# Altium PCB VoiceAssistant-v1.0.PcbDoc (part 1 of 3)
Units mm, origin at the board's own origin, x right, y up, seen from the top; angles counter-clockwise.
Board outline 90 x 90 mm, 2 copper layers (Top Layer, Bottom Layer); 340 components, 253 nets, 950 pads, 0 vias.
Unrouted connection lines stored in the file: 677.
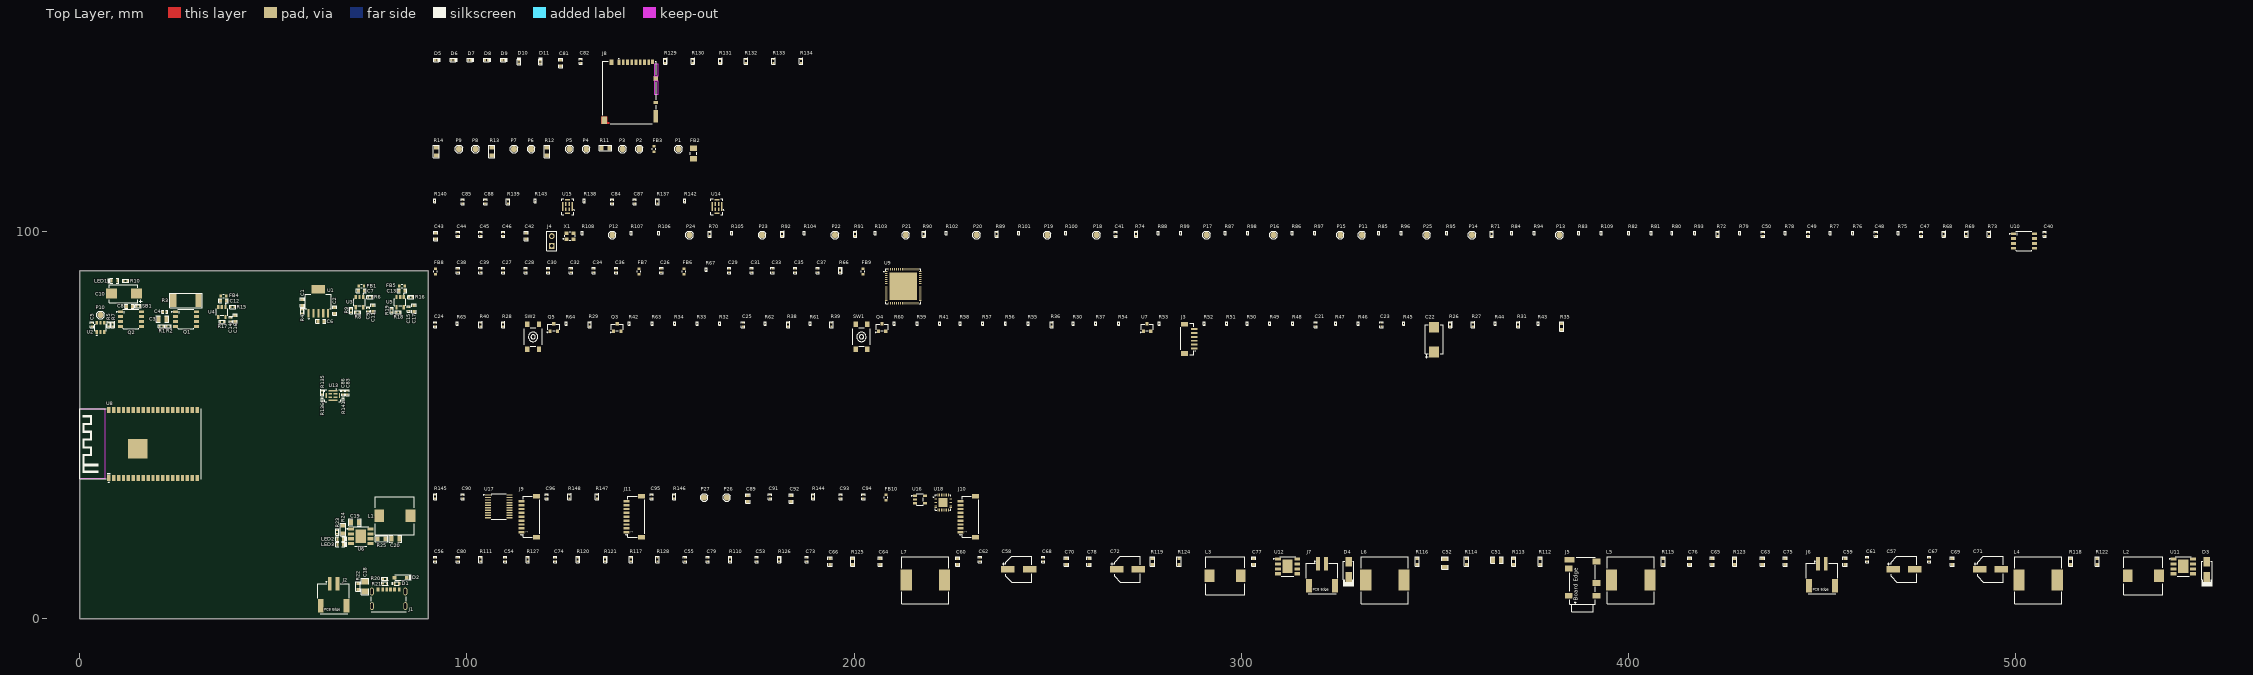
[diagram p0: Top Layer view]
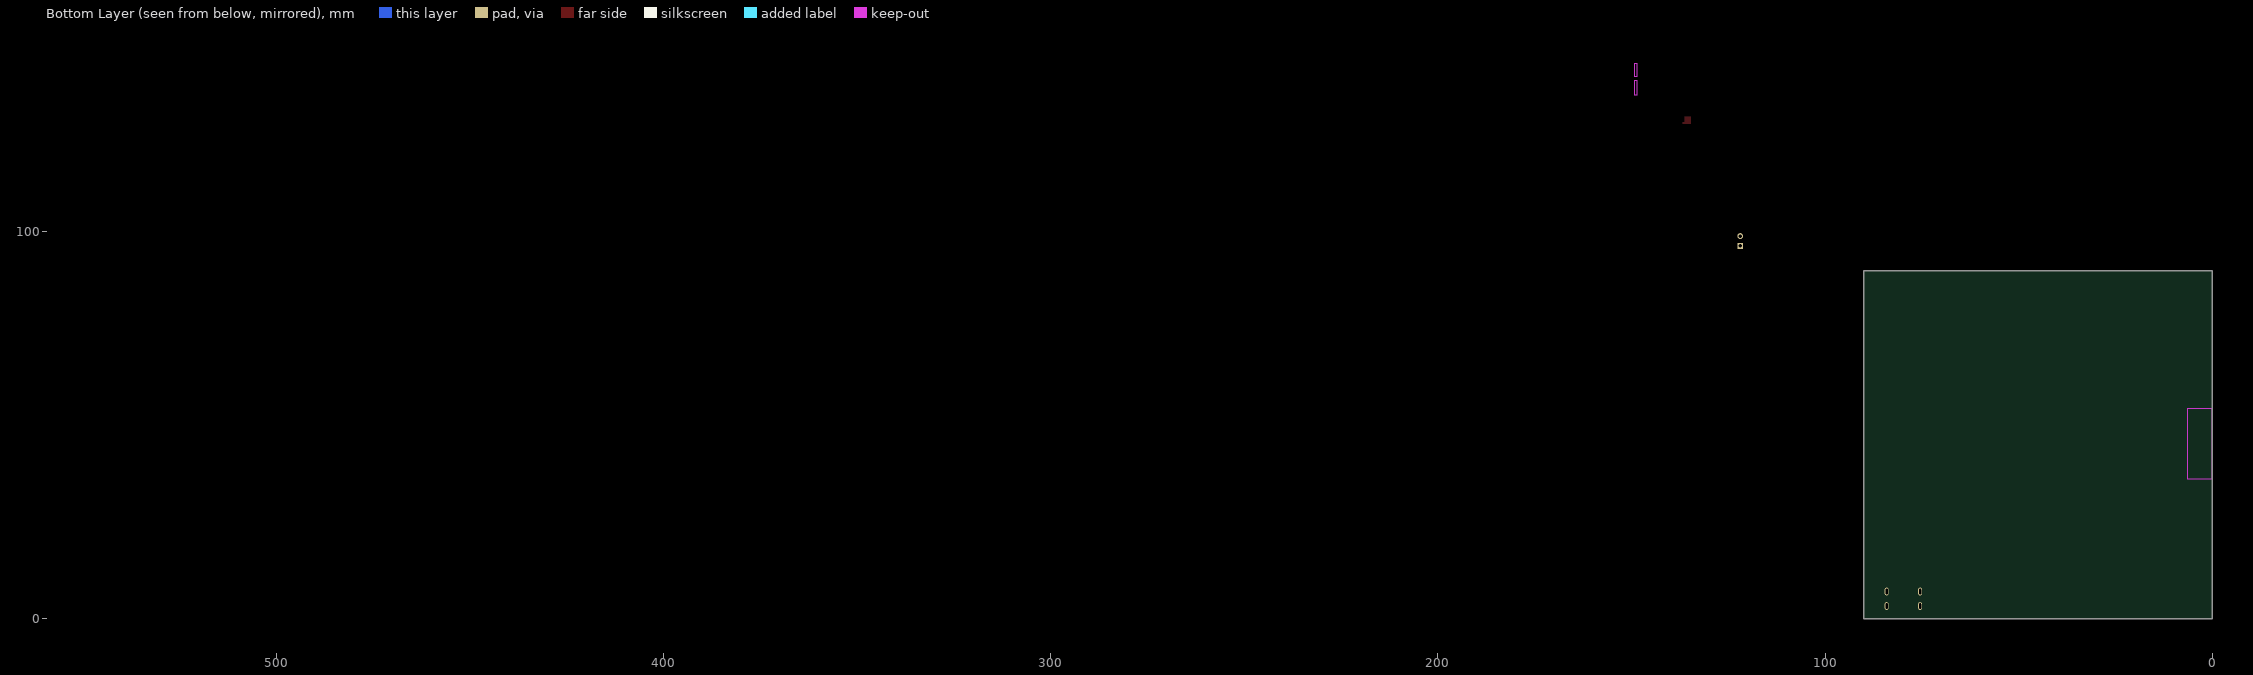
[diagram p1: Bottom Layer view, seen from below]

## Layer stack, top to bottom
Top Solder: solder mask 0.0102, Solder Resist, Dk 3.5
Top Layer: signal copper 0.0356
Dielectric 1: dielectric 0.32, FR-4, Dk 4.8
Bottom Layer: signal copper 0.0356
Bottom Solder: solder mask 0.0102, Solder Resist, Dk 3.5

## Board outline
0,0 0,90 90,90 90,0

## Design rules (kind name [scope] priority, off if disabled: settings)
Clearance [All] p1: gap=0.254 ignorepadtopadclearanceinfootprint=TRUE except(0: Arc-Hole Track-Hole SMDPad-Hole THPad-Hole Via-Hole Fill-Hole Poly-Hole Region-Hole Text-Hole)
MinimumSolderMaskSliver [All] p1: minsoldermaskwidth=0
PolygonConnect [All] p1: thpad.connectstyle=Relief thpad.reliefconductorwidth=0.381 thpad.reliefentries=4 thpad.polygonreliefangle="45 Angle" thpad.airgapwidth=0.254 smdpad.connectstyle=Direct smdpad.reliefconductorwidth=0.254 smdpad.reliefentries=4 smdpad.polygonreliefangle="90 Angle" smdpad.airgapwidth=0.254 via.connectstyle=Direct via.reliefconductorwidth=0.254 via.reliefentries=4 via.polygonreliefangle="90 Angle" via.airgapwidth=0.254
RoutingVias [All] p1: holewidth=0.3 width=0.6 viastyle="Through Hole" minholewidth=0.3 minwidth=0.6 maxholewidth=0.3 maxwidth=0.6
SilkToSilkClearance [All] p1: silktosilkclearance=0.127
SilkToSolderMaskClearance [IsPad] p1: minsilkscreentomaskgap=0 clearancetoexposedcopper=TRUE
SolderMaskExpansion [All] p1: expansion=0.102 istentingtop=FALSE
UnRoutedNet [All] p1: checkbadconnections=TRUE
Width [All] p1: maxlimit=1.27 minlimit=0.203 preferedwidth=0.381 minimp=50.000000 maximp=50.000000 favimp=50.000000
26 further rules are at their usual default settings.

## Classes and differential pairs
component class U_SD-Card-Sheet: C81 C82 D5 D6 D7 D8 D9 D10 D11 J8 R129 R130 R131 R132 R133 R134
component class U_Power-Sheet: C1 C2 C3 C4 C5 C6 C7 C8 C9 C10 C11 C12 C13 C14 C15 C16 C17 FB1 FB2 FB3 FB4 FB5 LED1 P1 P2 P3 P4 P5 P6 P7 P8 P9 P10 Q1 Q2 R1 R2 R3 R4 R5 R6 R7 R8 R9 R10 R11 R12 R13 R14 R15 R16 R17 R18 R19 SB1 U1 U2 U3 U4 U5
component class U_MICs-Sheet: C83 C84 C85 C86 C87 C88 R135 R136 R137 R138 R139 R140 R141 R142 R143 U13 U14 U15
component class U_DSP-Sheet-2: C40 C41 C42 C43 C44 C45 C46 C47 C48 C49 C50 J4 P11 P12 P13 P14 P15 P16 P17 P18 P19 P20 P21 P22 P23 P24 P25 R68 R69 R70 R71 R72 R73 R74 R75 R76 R77 R78 R79 R80 R81 R82 R83 R84 R85 R86 R87 R88 R89 R90 R91 R92 R93 R94 R95 R96 R97 R98 R99 R100 R101 R102 R103 R104 R105 R106 R107 R108 R109 U10 X1
component class U_DSP-Sheet-1: C26 C27 C28 C29 C30 C31 C32 C33 C34 C35 C36 C37 C38 C39 FB6 FB7 FB8 FB9 R66 R67 U9
component class U_Controller-Sheet: C21 C22 C23 C24 C25 J3 Q3 Q4 Q5 R26 R27 R28 R29 R30 R31 R32 R33 R34 R35 R36 R37 R38 R39 R40 R41 R42 R43 R44 R45 R46 R47 R48 R49 R50 R51 R52 R53 R54 R55 R56 R57 R58 R59 R60 R61 R62 R63 R64 R65 SW1 SW2 U7 U8
component class U_Charging-Sheet: C18 C19 C20 D1 D2 J1 J2 L1 LED2 LED3 R20 R21 R22 R23 R24 R25 U6
component class U_Buttons-LED-Sheet: C89 C90 C91 C92 C93 C94 C95 C96 FB10 J9 J10 J11 P26 P27 R144 R145 R146 R147 R148 U16 U17 U18
component class U_Amplifier-Sheet: C51 C52 C53 C54 C55 C56 C57 C58 C59 C60 C61 C62 C63 C64 C65 C66 C67 C68 C69 C70 C71 C72 C73 C74 C75 C76 C77 C78 C79 C80 D3 D4 J5 J6 J7 L2 L3 L4 L5 L6 L7 R110 R111 R112 R113 R114 R115 R116 R117 R118 R119 R120 R121 R122 R123 R124 R125 R126 R127 R128 U11 U12

## Components (designator, comment, footprint, x,y, rotation, side; value= is the part's Value field where it differs from the comment)
C1 "10uF" Cap-0603 57.48,81.788 r270 top
C2 "10nF" Cap-0603 65.811,79.729 r270 top
C3 "22uF" Cap-0805 21.361,77.495 r0 top
C4 "100nF" Cap-0402 21.907,79.4 r0 top
C5 "100nF" Cap-0402 3.124,76.06 r90 top
C6 "22uF" Cap-0603 62.23,76.937 r0 top
C7 "10uF" Cap-0603 72.695,84.76 r0 top
C8 "10uF" Cap-0603 12.769,80.823 r0 top
C9 "100nF" Cap-0402 74.473,79.921 r270 top
C10 "100uF" Case-E 14.58,84.049 r180 top
C11 "10uF" Cap-0603 75.717,80.213 r270 top
C12 "10uF" Cap-0603 37.109,82.22 r0 top
C13 "10uF" Cap-0603 83.236,84.76 r0 top
C14 "100nF" Cap-0402 38.964,77.381 r270 top
C15 "100nF" Cap-0402 84.988,80.094 r270 top
C16 "10uF" Cap-0603 40.132,77.673 r270 top
C17 "10uF" Cap-0603 86.309,80.213 r270 top
C18 "4.7nF" Cap-1206 73.635,8.356 r270 top
C19 "22uF" Cap-0805 71.061,24.994 r180 top
C20 "22uF" Cap-0805 81.483,20.726 r180 top
C21 "100nF" Cap-0402 319.278,76.073 r90 top
C22 "100uF" Case-E 349.885,68.961 r90 top
C23 "100nF" Cap-0402 336.296,76.073 r90 top
C24 "100nF" Cap-0402 91.821,76.073 r90 top
C25 "100nF" Cap-0402 171.323,76.073 r90 top
C26 "100nF" Cap-0402 150.241,90.043 r90 top
C27 "100nF" Cap-0402 109.347,90.043 r90 top
C28 "100nF" Cap-0402 115.189,90.043 r90 top
C29 "100nF" Cap-0402 167.767,90.043 r90 top
C30 "100nF" Cap-0402 121.031,90.043 r90 top
C31 "100nF" Cap-0402 173.609,90.043 r90 top
C32 "100nF" Cap-0402 126.873,90.043 r90 top
C33 "100nF" Cap-0402 178.943,90.043 r90 top
C34 "100nF" Cap-0402 132.715,90.043 r90 top
C35 "100nF" Cap-0402 184.785,90.043 r90 top
C36 "100nF" Cap-0402 138.557,90.043 r90 top
C37 "100nF" Cap-0402 190.627,90.043 r90 top
C38 "100nF" Cap-0402 97.663,90.043 r90 top
C39 "100nF" Cap-0402 103.505,90.043 r90 top
C40 "100nF" Cap-0402 507.619,99.441 r90 top
C41 "100nF" Cap-0402 267.589,99.441 r90 top
C42 "18pF" Cap-0603 115.316,98.933 r90 top
C43 "18pF" Cap-0603 91.948,98.933 r90 top
C44 "100nF" Cap-0402 97.663,99.441 r90 top
C45 "1uF" Cap-0402 103.505,99.441 r90 top
C46 "100nF" Cap-0402 109.347,99.441 r90 top
C47 "1uF" Cap-0402 475.742,99.441 r90 top
C48 "1uF" Cap-0402 464.058,99.441 r90 top
C49 "1uF" Cap-0402 446.532,99.441 r90 top
C50 "1uF" Cap-0402 434.848,99.441 r90 top
C51 "22uF" Cap-0805 366.141,15.24 r0 top
C52 "22uF" Cap-0805 352.679,14.478 r90 top
C53 "100nF" Cap-0402 174.879,15.367 r90 top
C54 "100nF" Cap-0402 109.855,15.367 r90 top
C55 "39pF" Cap-0402 156.337,15.367 r90 top
C56 "39pF" Cap-0402 91.821,15.367 r90 top
C57 "470uF" RVT1C471M0607 471.297,12.573 r0 top
C58 "470uF" RVT1C471M0607 242.57,12.573 r0 top
C59 "10uF" Cap-0603 456.057,14.859 r90 top
C60 "10uF" Cap-0603 226.822,14.859 r90 top
C61 "1uF" Cap-0402 461.772,15.367 r90 top
C62 "1uF" Cap-0402 232.537,15.367 r90 top
C63 "1nF" CAP-0603 434.721,14.859 r90 top
C64 "1nF" CAP-0603 206.756,14.859 r90 top
C65 "3.3nF" Cap-0603 421.767,14.859 r90 top
C66 "3.3nF" Cap-0603 193.802,14.859 r90 top
C67 "1uF" Cap-0402 477.774,15.367 r90 top
C68 "1uF" Cap-0402 248.92,15.367 r90 top
C69 "10uF" Cap-0603 483.743,14.859 r90 top
C70 "10uF" Cap-0603 254.889,14.859 r90 top
C71 "470uF" RVT1C471M0607 493.649,12.573 r0 top
C72 "470uF" RVT1C471M0607 270.637,12.573 r0 top
C73 "100nF" Cap-0402 187.833,15.367 r90 top
C74 "100nF" Cap-0402 122.809,15.367 r90 top
C75 "330pF" Cap-0603 440.563,14.859 r90 top
C76 "330pF" Cap-0603 415.925,14.859 r90 top
C77 "330pF" Cap-0603 303.276,14.859 r90 top
C78 "330pF" Cap-0603 260.731,14.859 r90 top
C79 "39pF" Cap-0402 162.179,15.367 r90 top
C80 "39pF" Cap-0402 97.663,15.367 r90 top
C81 "10uF" Cap-0603 124.206,143.637 r90 top
C82 "100nF" Cap-0402 129.413,144.145 r90 top
C83 "1uF" Cap-0402 69.113,58.471 r90 top
C84 "1uF" Cap-0402 137.541,107.823 r90 top
C85 "1uF" Cap-0402 98.933,107.823 r90 top
C86 "100nF" Cap-0402 68.072,58.471 r90 top
C87 "100nF" Cap-0402 143.383,107.823 r90 top
C88 "100nF" Cap-0402 104.775,107.823 r90 top
C89 "10uF" Cap-0603 172.593,31.115 r90 top
C90 "100nF" Cap-0402 98.933,31.623 r90 top
C91 "100nF" Cap-0402 178.308,31.623 r90 top
C92 "10uF" Cap-0603 183.769,31.115 r90 top
C93 "1uF" Cap-0402 196.596,31.623 r90 top
C94 "100nF" Cap-0402 202.438,31.623 r90 top
C95 "220nF" Cap-0402 147.701,31.623 r90 top
C96 "100nF" Cap-0402 120.65,31.623 r90 top
D1 "LESD5D5.0CT1G" SOD-523 81.876,9.169 r180 top
D2 "1N5819HW-7-F" SOD-123 82.851,10.706 r0 top
D3 "SS34" SMA 549.529,12.827 r90 top
D4 "SS34" SMA 327.787,12.827 r90 top
D5 "LESD8D3.3CAT5G" SOD-882 92.075,144.399 r0 top
D6 "LESD8D3.3CAT5G" SOD-882 96.393,144.399 r0 top
D7 "LESD8D3.3CAT5G" SOD-882 100.711,144.399 r0 top
D8 "LESD8D3.3CAT5G" SOD-882 105.029,144.399 r0 top
D9 "LESD8D3.3CAT5G" SOD-882 109.347,144.399 r0 top
D10 "LESD8D3.3CAT5G" SOD-882 113.411,143.891 r90 top
D11 "LESD8D3.3CAT5G" SOD-882 118.999,143.891 r90 top
FB1 "BLM18SG121TZ1D" "IND-0603 (1608 Metric)" 72.695,86.004 r0 top value=25mR
FB2 "BLM31KN121SZ1L" IND-1206 158.496,120.269 r90 top value=9mR
FB3 "BLM18SG121TZ1D" "IND-0603 (1608 Metric)" 148.336,121.412 r90 top value=25mR
FB4 "BLM18SG121TZ1D" "IND-0603 (1608 Metric)" 37.109,83.464 r0 top value=25mR
FB5 "BLM18SG121TZ1D" "IND-0603 (1608 Metric)" 83.236,86.004 r0 top value=25mR
FB6 "BLM18SG121TZ1D" "IND-0603 (1608 Metric)" 156.083,89.789 r90 top value=25mR
FB7 "BLM18SG121TZ1D" "IND-0603 (1608 Metric)" 144.399,89.789 r90 top value=25mR
FB8 "BLM18SG121TZ1D" "IND-0603 (1608 Metric)" 91.821,89.789 r90 top value=25mR
FB9 "BLM18SG121TZ1D" "IND-0603 (1608 Metric)" 202.311,89.789 r90 top value=25mR
FB10 "BLM18SG121TZ1D" "IND-0603 (1608 Metric)" 208.28,31.369 r90 top value=25mR
J1 "U262-061N-4BVC11" U262-061N-4BVC11 79.756,5.461 r0 top
J2 "WAFER-PH2.0-2PWB" WAFER-PH2.0-2PWB 65.548,6.218 r0 top
J3 "Voltlink Target" "Voltlink Target" 286.639,72.39 r90 top
J4 "X6511WV-02H-C60D30" HDR1X2_ 121.92,96.393 r90 top
J5 "PJ-342B-TX-SMT" PJ-342B-TX-SMT_ 388.239,10.668 r90 top
J6 "WAFER-PH2.0-2PWB" WAFER-PH2.0-2PWB 450.088,11.43 r0 top
J7 "WAFER-PH2.0-2PWB" WAFER-PH2.0-2PWB 320.929,11.43 r0 top
J8 "DM3BT-DSF-PEJS" DM3BT-DSF-PEJS 142.113,136.398 r0 top
J9 "X1002WRS-09E-LPSWHF" X1002WRS-09E-LPSWHF 116.078,26.416 r90 top
J10 "X1002WRS-09E-LPSWHF" X1002WRS-09E-LPSWHF 229.489,26.416 r90 top
J11 "X1002WRS-09E-LPSWHF" X1002WRS-09E-LPSWHF 143.129,26.416 r90 top
L1 "4.7uH" YSLF1045-4R7M 81.376,26.657 r0 top
L2 "4.7uH" YSLF1045-4R7M 533.146,11.176 r0 top
L3 "4.7uH" YSLF1045-4R7M 295.91,11.176 r0 top
L4 "33uH" SMDRI129-330MT 505.968,10.033 r0 top
L5 "33uH" SMDRI129-330MT 400.685,10.033 r0 top
L6 "33uH" SMDRI129-330MT 337.185,10.033 r0 top
L7 "33uH" SMDRI129-330MT 218.44,10.033 r0 top
LED1 "RED" LED-0603 8.89,87.376 r180 top
LED2 "Emerald" LED-0603 67.246,20.65 r0 top
LED3 "RED" LED-0603 67.246,19.228 r0 top
P1 "TEST POINT" Test-point 154.686,121.412 r0 top
P2 "TEST POINT" Test-point 144.526,121.412 r0 top
P3 "TEST POINT" Test-point 140.208,121.412 r0 top
P4 "TEST POINT" Test-point 130.81,121.412 r0 top
P5 "TEST POINT" Test-point 126.492,121.412 r0 top
P6 "TEST POINT" Test-point 116.586,121.412 r0 top
P7 "TEST POINT" Test-point 112.141,121.412 r0 top
P8 "TEST POINT" Test-point 102.235,121.412 r0 top
P9 "TEST POINT" Test-point 97.917,121.412 r0 top
P10 "TEST POINT" Test-point 5.293,78.562 r0 top
P11 "TEST POINT" Test-point 331.216,99.187 r0 top
P12 "TEST POINT" Test-point 137.541,99.187 r0 top
P13 "TEST POINT" Test-point 382.27,99.187 r0 top
P14 "TEST POINT" Test-point 359.664,99.187 r0 top
P15 "TEST POINT" Test-point 325.628,99.187 r0 top
P16 "TEST POINT" Test-point 308.356,99.187 r0 top
P17 "TEST POINT" Test-point 291.084,99.187 r0 top
P18 "TEST POINT" Test-point 262.636,99.187 r0 top
P19 "TEST POINT" Test-point 249.936,99.187 r0 top
P20 "TEST POINT" Test-point 231.648,99.187 r0 top
P21 "TEST POINT" Test-point 213.36,99.187 r0 top
P22 "TEST POINT" Test-point 195.072,99.187 r0 top
P23 "TEST POINT" Test-point 176.276,99.187 r0 top
P24 "TEST POINT" Test-point 157.48,99.187 r0 top
P25 "TEST POINT" Test-point 347.98,99.187 r0 top
P26 "TEST POINT" Test-point 167.132,31.369 r0 top
P27 "TEST POINT" Test-point 161.29,31.369 r0 top
Q1 "IRF7410TRPBF" SOP-8 27.381,77.495 r0 top
Q2 "IRF7410TRPBF" SOP-8 13.183,77.495 r0 top
Q3 "SS8050-G" SOT-23 138.811,75.311 r0 top
Q4 "LBSS138LT1G" SOT-23 207.264,75.311 r0 top
Q5 "LBSS138LT1G" SOT-23 122.428,75.311 r0 top
R1 "100K" Res-0402 21.069,75.59 r0 top
R2 "100K" Res-0402 22.847,75.59 r0 top
R3 "0R" RES-2512 27.381,82.296 r180 top
R4 "10K" Res-0402 57.48,79.437 r90 top
R5 "0R" Res-0402 7.442,76.06 r270 top
R6 "10K" Res-0402 74.943,83.164 r180 top
R7 "10K" Res-0402 8.509,76.06 r90 top
R8 "52.3K" Res-0402 71.732,79.223 r0 top
R9 "30.1K" Res-0402 70.053,79.692 r270 top
R10 "1K" Res-0402 11.798,87.376 r0 top
R11 "0R" Res-0805 135.763,121.666 r0 top
R12 "0R" Res-0805 120.65,120.777 r90 top
R13 "0R" Res-0805 106.426,120.777 r90 top
R14 "0R" Res-0805 92.075,120.777 r90 top
R15 "10K" Res-0402 39.433,80.624 r180 top
R16 "10K" Res-0402 85.458,83.164 r180 top
R17 "0R" Res-0402 36.728,76.759 r0 top
R18 "52.3K" Res-0402 82.248,79.223 r0 top
R19 "30.1K" Res-0402 80.543,79.692 r270 top
R20 "5.1K" Res-0402 78.786,10.388 r0 top
R21 "5.1K" Res-0402 78.786,9.169 r0 top
R22 "1M" Res-0603 71.857,8.356 r270 top
R23 "1K" Res-0402 66.496,22.466 r90 top
R24 "316R" RES-0805 67.996,23.089 r270 top
R25 "1K" RES-0805 77.927,20.726 r0 top value=1kR
R26 "10K" Res-0402 354.076,76.073 r90 top
R27 "10K" Res-0402 359.918,76.073 r90 top
R28 "100K" Res-0402 109.347,76.073 r90 top
R29 "1K" Res-0402 131.699,76.073 r90 top
R30 "0R" Res-0201 256.667,76.327 r90 top
R31 "10K" Res-0402 371.602,76.073 r90 top
R32 "0R" Res-0201 165.354,76.327 r90 top
R33 "0R" Res-0201 159.512,76.327 r90 top
R34 "0R" Res-0201 153.67,76.327 r90 top
R35 "0R" Res-0603 382.905,75.565 r90 top
R36 "100K" Res-0402 251.079,76.073 r90 top
R37 "0R" Res-0201 262.509,76.327 r90 top
R38 "10K" Res-0402 183.007,76.073 r90 top
R39 "1K" Res-0402 194.183,76.073 r90 top
R40 "1K" Res-0402 103.505,76.073 r90 top
R41 "0R" Res-0201 222.123,76.327 r90 top
R42 "0R" Res-0201 141.986,76.327 r90 top
R43 "0R" Res-0201 376.809,76.327 r90 top
R44 "0R" Res-0201 365.633,76.327 r90 top
R45 "0R" Res-0201 342.011,76.327 r90 top
R46 "0R" Res-0201 330.327,76.327 r90 top
R47 "0R" Res-0201 324.485,76.327 r90 top
R48 "0R" Res-0201 313.309,76.327 r90 top
R49 "0R" Res-0201 307.467,76.327 r90 top
R50 "0R" Res-0201 301.625,76.327 r90 top
R51 "0R" Res-0201 296.291,76.327 r90 top
R52 "0R" Res-0201 290.449,76.327 r90 top
R53 "0R" Res-0201 278.892,76.327 r90 top
R54 "0R" Res-0201 268.351,76.327 r90 top
R55 "0R" Res-0201 244.983,76.327 r90 top
R56 "0R" Res-0201 239.141,76.327 r90 top
R57 "0R" Res-0201 233.299,76.327 r90 top
R58 "0R" Res-0201 227.457,76.327 r90 top
R59 "0R" Res-0201 216.281,76.327 r90 top
R60 "0R" Res-0201 210.439,76.327 r90 top
R61 "0R" Res-0201 188.722,76.327 r90 top
R62 "0R" Res-0201 177.038,76.327 r90 top
R63 "0R" Res-0201 147.828,76.327 r90 top
R64 "0R" Res-0201 125.603,76.327 r90 top
R65 "0R" Res-0201 97.536,76.327 r90 top
R66 "10K" Res-0402 196.469,90.043 r90 top
R67 "0R" Res-0201 161.798,90.297 r90 top
R68 "10K" Res-0402 481.584,99.441 r90 top
R69 "10K" Res-0402 487.426,99.441 r90 top
R70 "10K" Res-0402 162.687,99.441 r90 top
R71 "10K" Res-0402 364.744,99.441 r90 top
R72 "100K" Res-0402 423.164,99.441 r90 top
R73 "100K" Res-0402 493.268,99.441 r90 top
R74 "100K" Res-0402 272.923,99.441 r90 top
R75 "33R" Res-0201 469.773,99.695 r90 top
R76 "33R" Res-0201 458.089,99.695 r90 top
R77 "33R" Res-0201 452.247,99.695 r90 top
R78 "33R" Res-0201 440.563,99.695 r90 top
R79 "33R" Res-0201 428.879,99.695 r90 top
R80 "33R" Res-0201 411.353,99.695 r90 top
R81 "33R" Res-0201 406.019,99.695 r90 top
R82 "33R" Res-0201 400.177,99.695 r90 top
R83 "33R" Res-0201 387.223,99.695 r90 top
R84 "33R" Res-0201 369.951,99.695 r90 top
R85 "33R" Res-0201 335.534,99.695 r90 top
R86 "33R" Res-0201 313.182,99.695 r90 top
R87 "33R" Res-0201 295.91,99.695 r90 top
R88 "33R" Res-0201 278.638,99.695 r90 top
R89 "100K" Res-0402 236.855,99.441 r90 top
R90 "100K" Res-0402 218.059,99.441 r90 top
R91 "100K" Res-0402 200.279,99.441 r90 top
R92 "100K" Res-0402 181.483,99.441 r90 top
R93 "33R" Res-0201 417.195,99.695 r90 top
R94 "33R" Res-0201 375.793,99.695 r90 top
R95 "33R" Res-0201 353.187,99.695 r90 top
R96 "33R" Res-0201 341.376,99.695 r90 top
R97 "33R" Res-0201 319.024,99.695 r90 top
R98 "33R" Res-0201 301.752,99.695 r90 top
R99 "33R" Res-0201 284.48,99.695 r90 top
R100 "33R" Res-0201 254.762,99.695 r90 top
R101 "33R" Res-0201 242.57,99.695 r90 top
R102 "33R" Res-0201 223.774,99.695 r90 top
R103 "33R" Res-0201 205.486,99.695 r90 top
R104 "33R" Res-0201 187.198,99.695 r90 top
R105 "33R" Res-0201 168.402,99.695 r90 top
R106 "33R" Res-0201 149.606,99.695 r90 top
R107 "33R" Res-0201 142.494,99.695 r90 top
R108 "33R" Res-0201 129.794,99.695 r90 top
R109 "3.3K" Res-0201 393.065,99.695 r90 top
R110 "56k" Res-0402 168.021,15.367 r90 top value=56kR
R111 "56k" Res-0402 103.505,15.367 r90 top value=56kR
R112 "0R" Res-0603 377.317,14.859 r90 top
R113 "0R" Res-0603 370.459,14.859 r90 top
R114 "0R" Res-0603 358.267,14.859 r90 top
R115 "22.1K" Res-0603 409.067,14.859 r90 top
R116 "0R" Res-0603 345.567,14.859 r90 top
R117 "DNP" Res-0402 142.367,15.367 r90 top
R118 "1R" Res-0603 514.35,14.859 r90 top
R119 "1R" Res-0603 277.114,14.859 r90 top
R120 "18K" Res-0402 128.651,15.367 r90 top value=18kR
R121 "28K" Res-0402 135.763,15.367 r90 top
R122 "510K" Res-0603 521.208,14.859 r90 top
R123 "110K" Res-0603 427.609,14.859 r90 top
R124 "510K" Res-0603 283.972,14.859 r90 top
R125 "110K" Res-0603 199.644,14.859 r90 top
R126 "30K" Res-0402 180.721,15.367 r90 top
R127 "30K" Res-0402 115.697,15.367 r90 top
R128 "DNP" Res-0402 149.225,15.367 r90 top
R129 "10K" Res-0402 151.257,144.145 r90 top
R130 "10K" Res-0402 158.369,144.145 r90 top
R131 "10K" Res-0402 165.481,144.145 r90 top
R132 "10K" Res-0402 172.085,144.145 r90 top
R133 "10K" Res-0402 179.197,144.145 r90 top
R134 "10K" Res-0402 186.309,144.145 r90 top
R135 "10K" Res-0402 62.636,58.483 r270 top
R136 "33R" Res-0201 62.636,56.638 r270 top
R137 "10K" Res-0402 149.225,107.823 r90 top
R138 "33R" Res-0201 130.302,108.077 r90 top
R139 "10K" Res-0402 110.617,107.823 r90 top
R140 "33R" Res-0201 91.694,108.077 r90 top
R141 "33R" Res-0201 68.072,56.638 r90 top
R142 "33R" Res-0201 156.21,108.077 r90 top
R143 "33R" Res-0201 117.602,108.077 r90 top
R144 "10K" Res-0402 189.484,31.623 r90 top
R145 "10K" Res-0402 91.821,31.623 r90 top
R146 "52.3K" Res-0402 153.543,31.623 r90 top
R147 "30.1K" Res-0402 133.604,31.623 r90 top
R148 "100K" Res-0402 126.492,31.623 r90 top
SB1 "Solder Bridge 0402" "Solder Bridge 0402" 15.05,80.823 r180 top
SW1 "TS-1109S-C-B" TS-1109S-C-B 201.93,72.898 r90 top
SW2 "TS-1109S-C-B" TS-1109S-C-B 117.094,72.898 r90 top
U1 "TPS79633DCQR" SOT-223-6_ 61.595,82.067 r0 top
U2 "MAX16054AZT+T" TSOT-23-6 5.293,75.33 r90 top
U3 "TPS73601DBVR" SOT-23-5 72.212,81.864 r270 top
U4 "TPS73601DBVR" SOT-23-5 36.678,79.324 r270 top
U5 "TPS73601DBVR" SOT-23-5 82.728,81.864 r270 top
U6 "SLM6600" 8-SO-EP_ 72.542,21.361 r0 top
U7 "CAT809RTBI-GT3" SOT-23 275.717,75.311 r0 top
U8 "ESP32-WROVER-E-N16R8" ESP32-WROVER-E-N16R8 18.875,45.213 r90 top
U9 "ZL38063LDG1" QFN-64-EP(9x9) 212.725,85.979 r0 top
U10 "W25Q16JVSNIQ" SOP-8 502.285,97.663 r0 top
U11 "HT8691RSPER" 8-SO-EP_ 543.433,13.589 r0 top
U12 "HT8691RSPER" 8-SO-EP_ 312.039,13.589 r0 top
U13 "MP34DT06JTR" MP34DT06JTR 65.343,57.716 r90 top
U14 "MP34DT06JTR" MP34DT06JTR 164.592,106.553 r0 top
U15 "MP34DT06JTR" MP34DT06JTR 125.984,106.553 r0 top
U16 "TPS73601DBVR" SOT-23-5 217.043,30.861 r0 top
U17 "PCF8574APWR" TSSOP-20 108.204,29.083 r0 top
U18 "IS31FL3216A-QFLS3-TR" QFN-28-EP(4x4) 223.012,30.099 r0 top
X1 "12MHz" SMD2520-4P 126.619,98.933 r0 top

## Footprints (in the part's own frame and the unit in brackets; to place one, negate y for a bottom-side part, rotate by r counter-clockwise, add the part's x,y. Pads: shape width x height; smd on the part's side, far side on the other; paste and mask are expansions set on the pad)
8-SO-EP_ [mm]
  rect 1.505x0.802 smd: 1(-2.497,1.905) 2(-2.497,0.635) 3(-2.497,-0.635) 4(-2.497,-1.905) 5(2.498,-1.905) 6(2.498,-0.635) 7(2.498,0.635) 8(2.498,1.905)
  rect 2.613x3.502 smd: 9(0,0)
  silkscreen extent -3.53,-2.51 2.03,2.51, body extent -3,-2.45 3,2.45, height 1.7
Cap-0402 [mil]
  rect 18x25 smd mask+2.36: 1(-18.5,0) 2(18.5,0)
  silkscreen extent -31,-16 31,16, body extent -20,-10 20,10, height 19
Cap-0603 [mil]
  rect 30x35 smd mask+2.36: 1(-30,0) 2(30,0)
  silkscreen extent -49,-21 49,21, body extent -32,-16 31,16, height 34
CAP-0603 [mil]
  rect 30x35 smd mask+2.36: 1(-30,0) 2(30,0)
  silkscreen extent -49,-21 49,21, body extent -32,-16 31,16, height 34
Cap-0805 [mil] "SMD 0805"
  rect 40x60 smd mask+2.76: 1(-40,0) 2(40,0)
  silkscreen extent -64,-34 64,34, body extent -39,-25 39,25, height 30
Cap-1206 [mil] "SMD 1206"
  rect 60x70 smd: 1(-50,0) 2(50,0)
  silkscreen extent -84,-39 84,39, body extent -63,-31 63,32, height 39
Case-E [mm]
  rect 2.79x2.57 smd: 1(0,0) 2(6.44,0)
  silkscreen extent -1.56,-2.31 7.03,2.31, body extent -0.27,-2.21 6.92,2.21, height 2.88
DM3BT-DSF-PEJS [mm]
  rect 0.7x1.4 smd: 1(-2.85,7.45) 2(-1.75,7.45) 3(-0.65,7.45) 4(0.45,7.45) 5(1.55,7.45) 6(2.65,7.45) 7(3.75,7.45) 8(4.85,7.45)
  rect 1x1.4 smd: S1(-4.75,7.45)
  rect 1.2x1.2 smd: S2(6.65,3.25)
  rect 1.2x3.2 smd: S3(6.65,-6.55)
  rect 1.5x1.9 smd paste-2 mask+0: S4(-6.65,-7.55)
  rect 1.2x0.8 smd: SW-A(6.65,-2.95)
  rect 0.7x1.2 smd: SW-B(5.8,7.55)
  Top Layer region: -5.9,-7.85 -5.75,-8 -5.4,-8 -5.4,-8.5 -7.4,-8.5 -7.4,-6.6 -5.9,-6.6
  Keep-Out Layer region: 7.15,-0.95 6.4,-0.95 6.4,2.65 7.15,2.65
  Keep-Out Layer region: 7.15,3.85 6.4,3.85 6.4,7.1 7.15,7.1
  silkscreen extent -7,-8.4 6.85,8.46, body extent -6.98,-9.89 6.87,7.66, height 1.85
ESP32-WROVER-E-N16R8 [mm]
  rect 1.5x0.9 smd: 1(-8.75,11.43) 2(-8.75,10.16) 3(-8.75,8.89) 4(-8.75,7.62) 5(-8.75,6.35) 6(-8.75,5.08) 7(-8.75,3.81) 8(-8.75,2.54) 9(-8.75,1.27) 10(-8.75,0) 11(-8.75,-1.27) 12(-8.75,-2.54) 13(-8.75,-3.81) 14(-8.75,-5.08) 15(-8.75,-6.35) 16(-8.75,-7.62) 17(-8.75,-8.89) 18(-8.75,-10.16) 19(-8.75,-11.43) 20(8.75,-11.43) 21(8.75,-10.16) 22(8.75,-8.89) 23(8.75,-7.62) 24(8.75,-6.35) 25(8.75,-5.08) 26(8.75,-3.81) 27(8.75,-2.54) 28(8.75,-1.27) 29(8.75,0) 30(8.75,1.27) 31(8.75,2.54) 32(8.75,3.81) 33(8.75,5.08) 34(8.75,6.35) 35(8.75,7.62) 36(8.75,8.89) 37(8.75,10.16) 38(8.75,11.43)
  rect 5x5 smd: 39(-1.241,3.945)
  Keep-Out Layer region: 9.06,12.501 -8.97,12.501 -8.97,18.87 9.06,18.87
  silkscreen extent -9.88,-12.53 9.06,18.87, body extent -8.95,-12.52 9.05,18.87, height 3.65
HDR1X2_ [mm] "CONN HEADER VERT 2POS 2.54MM"
  rect 1.5x1.5 hole 0.9: 1(0,0)
  round 1.5 hole 0.9: 2(2.54,0)
  silkscreen extent -1.27,-1.27 3.81,1.27, body extent -1.27,-1.27 3.81,1.27, height 8.44
"IND-0603 (1608 Metric)" [mm] "0.063\" L x 0.032\" W (1.60mm x 0.80mm)"
  rect 0.6x0.8 smd: 1(-0.7,0) 2(0.7,0)
  silkscreen extent -0.2,-0.46 0.23,0.46, body extent -0.8,-0.4 0.8,0.4, height 0.78
IND-1206 [mm]
  rect 1.4x1.82 smd: 1(-1.36,0) 2(1.36,0)
  silkscreen extent -0.34,-0.85 0.34,0.85, body extent -1.6,-0.8 1.6,0.8, height 1.3
LED-0603 [mm]
  rect 0.5x1 smd: 1(-0.75,0) 2(0.75,0)
  silkscreen extent -1.12,-0.66 1.75,0.66, body extent -0.82,-0.37 0.82,0.36, height 0.68
MP34DT06JTR [mm]
  rect 0.4x0.95 smd: 1(0.425,-0.675) 2(0.425,0.675) 3(-0.425,0.675) 4(-0.425,-0.675)
  rect 0.35x2.3 smd: 5(-1.225,0) 5(1.225,0)
  rect 1.3x0.35 smd: 5(0,1.725) 5(0,-1.725)
  silkscreen extent -1.55,-2.05 1.74,2.05, body extent -1.5,-2 1.5,2, height 1.1
PJ-342B-TX-SMT_ [mm]
  rect 1.5x2 smd: 2(-4.65,3.6) 3(2.35,3.6) 5(-4.65,-3.6) 6(-1.35,-3.6) 7(4.15,-3.6)
  rect 1.5x2.6 smd: 4(4.65,3.321)
  round 0 hole 1.5 unplated: MH(-4.465,0) MH(2.535,0)
  silkscreen extent -8.84,-3.28 5.23,3.25, body extent -8.83,-4.23 5.17,4.27, height 5.25
QFN-28-EP(4x4) [mm]
  rect 0.665x0.22 smd: 1(-1.933,1.35) 2(-1.933,0.9) 3(-1.933,0.45) 4(-1.933,0) 5(-1.933,-0.45) 6(-1.933,-0.9) 7(-1.933,-1.35) 15(1.933,-1.35) 16(1.933,-0.9) 17(1.933,-0.45) 18(1.933,0) 19(1.933,0.45) 20(1.933,0.9) 21(1.933,1.35)
  rect 0.22x0.665 smd: 8(-1.35,-1.933) 9(-0.9,-1.933) 10(-0.45,-1.933) 11(0,-1.933) 12(0.45,-1.933) 13(0.9,-1.933) 14(1.35,-1.933) 22(1.35,1.933) 23(0.9,1.933) 24(0.45,1.933) 25(0,1.933) 26(-0.45,1.933) 27(-0.9,1.933) 28(-1.35,1.933)
  rect 2.4x2.4 smd: 29(0,0)
  silkscreen extent -2.51,-2 2,2, body extent -1.96,-1.96 1.96,1.96, height 0.7
QFN-64-EP(9x9) [mm]
  rect 0.762x0.254 smd: 1(-4.4,3.75)
  rect 0.7x0.25 smd: 2(-4.4,3.25) 3(-4.4,2.75) 4(-4.4,2.25) 5(-4.4,1.75) 6(-4.4,1.25) 7(-4.4,0.75) 8(-4.4,0.25) 9(-4.4,-0.25) 10(-4.4,-0.75) 11(-4.4,-1.25) 12(-4.4,-1.75) 13(-4.4,-2.25) 14(-4.4,-2.75) 15(-4.4,-3.25) 16(-4.4,-3.75) 33(4.4,-3.75) 34(4.4,-3.25) 35(4.4,-2.75) 36(4.4,-2.25) 37(4.4,-1.75) 38(4.4,-1.25) 39(4.4,-0.75) 40(4.4,-0.25) 41(4.4,0.25) 42(4.4,0.75) 43(4.4,1.25) 44(4.4,1.75) 45(4.4,2.25) 46(4.4,2.75) 47(4.4,3.25) 48(4.4,3.75)
  rect 0.25x0.7 smd: 17(-3.75,-4.4) 18(-3.25,-4.4) 19(-2.75,-4.4) 20(-2.25,-4.4) 21(-1.75,-4.4) 22(-1.25,-4.4) 23(-0.75,-4.4) 24(-0.25,-4.4) 25(0.25,-4.4) 26(0.75,-4.4) 27(1.25,-4.4) 28(1.75,-4.4) 29(2.25,-4.4) 30(2.75,-4.4) 31(3.25,-4.4) 32(3.75,-4.4) 49(3.75,4.4) 50(3.25,4.4) 51(2.75,4.4) 52(2.25,4.4) 53(1.75,4.4) 54(1.25,4.4) 55(0.75,4.4) 56(0.25,4.4) 57(-0.25,4.4) 58(-0.75,4.4) 59(-1.25,4.4) 60(-1.75,4.4) 61(-2.25,4.4) 62(-2.75,4.4) 63(-3.25,4.4) 64(-3.75,4.4)
  rect 7.15x7.15 smd: 65(0,0)
  silkscreen extent -5,-4.5 4.54,4.5, body extent -4.52,-4.52 4.52,4.52, height 0.9
Res-0201 [mm]
  rect 0.27x0.37 smd mask+0.055: 1(-0.275,0) 2(0.275,0)
  silkscreen extent -0.48,-0.25 0.48,0.25, body extent -0.3,-0.15 0.3,0.15, height 0.29
Res-0402 [mil]
  rect 18x25 smd mask+2.17: 1(-18.5,0) 2(18.5,0)
  silkscreen extent -32,-17 32,16, body extent -23,-11 23,11, height 16
Res-0603 [mil]
  rect 30x35 smd: 1(-30,0) 2(30,0)
  silkscreen extent -48,-21 48,21, body extent -31,-17 31,17, height 18
Res-0805 [mil] "SMD 0805"
  rect 40x50 smd: 1(-40,0) 2(40,0)
  silkscreen extent -64,-29 64,29, body extent -39,-25 39,24, height 24
RES-0805 [mil] "SMD 0805"
  rect 40x50 smd: 1(-40,0) 2(40,0)
  silkscreen extent -64,-29 64,29, body extent -39,-25 39,24, height 24
RES-2512 [mm]
  rect 1.6x3.4 smd: 1(-3.25,0) 2(3.25,0)
  silkscreen extent -4.24,-1.85 4.24,1.85, body extent -3.17,-1.63 3.18,1.63, height 0.58
RVT1C471M0607 [mm]
  rect 3.5x1.6 smd: 1(-2.794,0.279) 2(2.806,0.279)
  silkscreen extent -4.27,-3.05 3.33,3.61, body extent -3.3,-3.05 3.3,3.55, height 7.94
SMA [mm]
  rect 2.5x1.7 smd: 1(-2,0) 2(2,0)
  silkscreen extent -4.45,-1.42 2.06,1.42, body extent -2.6,-1.3 2.6,1.3, height 2.4
SMD2520-4P [mm]
  rect 1x0.9 smd: 1(-0.925,-0.775) 2(0.925,-0.775) 3(0.925,0.775) 4(-0.925,0.775)
  silkscreen extent -1.73,-1.09 1.35,1.09, body extent -1.3,-1.05 1.3,1.05, height 0.55
SMDRI129-330MT [mm]
  rect 2.9x5.4 smd: 1(-4.95,0) 2(4.95,0)
  silkscreen extent -6.07,-6.07 6.07,6.07, body extent -6,-6 6,6, height 8.08
SOD-123 [mm]
  rect 0.95x0.9 smd: 1(-1.575,0) 2(1.575,0)
  silkscreen extent -1.37,-0.8 2.82,0.8, body extent -1.82,-0.78 1.83,0.78, height 1.5
SOD-523 [mm] "SOD-523 Schottky Barrier Diodes (SBD) ROHS"
  rect 0.6x0.7 smd: 1(-0.6,0) 2(0.6,0)
  silkscreen extent -0.61,-0.53 1.42,0.53, body extent -0.8,-0.4 0.8,0.4, height 0.7
SOD-882 [mm]
  rect 0.5x0.8 smd mask+0.055: 1(-0.35,0) 2(0.35,0)
  silkscreen extent -0.69,-0.53 1.14,0.53, body extent -0.49,-0.29 0.49,0.29, height 0.48
"Solder Bridge 0402" [mil]
  rect 18x25 smd mask+2.17: 1(-18.5,0) 2(18.5,0)
  silkscreen extent -32,-17 32,16
SOP-8 [mm]
  rect 1.3x0.7 smd: 1(-2.75,1.905) 2(-2.75,0.635) 3(-2.75,-0.635) 4(-2.75,-1.905) 5(2.75,-1.905) 6(2.75,-0.635) 7(2.75,0.635) 8(2.75,1.905)
  silkscreen extent -3.69,-2.57 2.03,2.57, body extent -3.1,-2.5 3.1,2.5, height 1.76
SOT-23 [mm] "TRANS NPN 40V 0.6A SOT23"
  rect 0.82x0.92 smd: 1(-0.95,-1) 2(0.95,-1) 3(0,1)
  silkscreen extent -1.68,-1.3 1.55,0.81, body extent -1.5,-1.25 1.5,1.25, height 1.05
SOT-23-5 [mm]
  rect 1.1x0.6 smd: 1(-1.3,0.95) 2(-1.3,0) 3(-1.3,-0.95) 4(1.3,-0.95) 5(1.3,0.95)
  silkscreen extent -2.13,-1.5 0.88,1.5, body extent -1.4,-1.45 1.4,1.45, height 1.45
SOT-223-6_ [mm]
  rect 0.55x2.15 smd: 1(-2.54,-3.1) 2(-1.27,-3.1) 3(0,-3.1) 4(1.27,-3.1) 5(2.54,-3.1)
  rect 3.5x2.2 smd: 6(0,3.1)
  silkscreen extent -3.33,-4.51 3.33,1.84, body extent -3.27,-3.63 3.27,3.63, height 1.8
Test-point [mil]
  oct 60x60 smd: 1(0,0)
  silkscreen extent -37,-37 37,37
TS-1109S-C-B [mm]
  rect 1.4x1.1 smd: 1(-3.25,-1.5) 2(3.25,-1.5) 3(3.25,1.5) 4(-3.25,1.5)
  silkscreen extent -2.41,-2.31 2.41,2.31, body extent -3.5,-2.25 3.5,2.25, height 4.3
TSOT-23-6 [mm]
  rect 1x0.6 smd: 1(-1.2,0.95) 2(-1.2,0) 3(-1.2,-0.95) 4(1.2,-0.95) 5(1.2,0) 6(1.2,0.95)
  silkscreen extent -1.98,-1.5 0.86,1.5, body extent -1.41,-1.45 1.41,1.45, height 1
TSSOP-20 [mm]
  rect 1.6x0.32 smd: 1(-2.8,2.925) 2(-2.8,2.275) 3(-2.8,1.625) 4(-2.8,0.975) 5(-2.8,0.325) 6(-2.8,-0.325) 7(-2.8,-0.975) 8(-2.8,-1.625) 9(-2.8,-2.275) 10(-2.8,-2.925) 11(2.8,-2.925) 12(2.8,-2.275) 13(2.8,-1.625) 14(2.8,-0.975) 15(2.8,-0.325) 16(2.8,0.325) 17(2.8,0.975) 18(2.8,1.625) 19(2.8,2.275) 20(2.8,2.925)
  silkscreen extent -3.88,-3.3 1.95,3.3, body extent -3.2,-3.25 3.2,3.25, height 1.2
U262-061N-4BVC11 [mm]
  rect 0.7x1 smd: A5(0.5,2.125) A9(1.52,2.125) A12(2.75,2.125) B5(-0.5,2.125) B9(-1.52,2.125) B12(-2.75,2.125)
  oval 1x2 hole 0.5 slot 1.4 at 90 deg: MH1(-4.32,1.625) MH2(4.32,1.625) MH3(4.32,-2.125) MH4(-4.32,-2.125)
  silkscreen extent -4.52,-3.57 4.52,0.34, body extent -4.48,-4.78 4.48,2.38, height 3.2
"Voltlink Target" [mm]
  rect 0.5x1.6 smd: 1(-2.5,-1.262) 2(-1.5,-1.262) 3(-0.5,-1.262) 4(0.5,-1.262) 5(1.5,-1.262) 6(2.5,-1.262)
  rect 1.2x1.8 smd: MP1(-3.8,1.262) MP2(3.8,1.262)
  silkscreen extent -4.06,-1.68 4.06,2.17, body extent -4,-1.49 4,2.11, height 4.25
WAFER-PH2.0-2PWB [mm]
  rect 1x3.5 smd: 1(-1,2.85) 2(1,2.85)
  rect 1.5x3.5 smd: MP1(-3.35,-2.85) MP2(3.35,-2.85)
  silkscreen extent -4.09,-4.85 4.04,3.56, body extent -4.03,-4.8 3.97,3.7, height 5.59
X1002WRS-09E-LPSWHF [mm]
  rect 0.6x1.55 smd: 1(-4,1.933) 2(-3,1.933) 3(-2,1.933) 4(-1,1.933) 5(0,1.933) 6(1,1.933) 7(2,1.933) 8(3,1.933) 9(4,1.933)
  rect 1.2x1.8 smd: MP1(5.3,-1.933) MP2(-5.3,-1.933)
  silkscreen extent -5.31,-2.74 5.31,2.16, body extent -5.25,-2.69 5.25,2.31, height 2.45
YSLF1045-4R7M [mm]
  rect 2.5x3.2 smd: 1(-4.05,0) 2(4.05,0)
  silkscreen extent -5.05,-4.9 5.05,4.9, body extent -5,-4.85 5,4.85, height 4.5

## Part data
C1 C7 C8 C11 C12 C13 C16 C17 C59 C60 C69 C70 C81 C89 C92: library part CC0603KRX5R7BB106, "CAP CER 10UF 16V X5R 0603", Case Code (Imperial)=0603, Case Code (Metric)=1608, LCSC Part Number=C2936601, Manufacturer=Yageo, Max Operating Temperature=85°C, Min Operating Temperature=-55°C, Supplier Part Number 1=311-3486-1-ND, Tolerance=10%, Voltage Rating=16V, Capacitance=10uF, Case/Package=0603, Category="Ceramic Capacitors", ComponentLink1Description=http://www.yageo.com/documents/recent/UPY-GPHC_X5R_4V-to-50V_25.pdf?src-supplier=Digi-Key, ComponentLink1URL=http://www.yageo.com/documents/recent/UPY-GPHC_X5R_4V-to-50V_25.pdf?src-supplier=Digi-Key, Item Type=Capacitor, Manufacturer Part Number=CC0603KRX5R7BB106, Mount="Surface Mount", Packaging="Cut Tape", Pricing 1="1=0.68000, 10=0.48000, 50=0.36300, 100=0.31610, 500=0.23416, 1000=0.19903 (USD)", RoHS=Yes, RoHS Compliant=Yes, Stock 1=240725, Supplier 1=Digi-Key
C2: library part CC0603JRNPO9BN103, "CAP CER 10000PF 50V C0G/NPO 0603", Case/Package=0603, LCSC Part Number=C389113, Manufacturer=Yageo, Max Operating Temperature=125°C, Min Operating Temperature=-55°C, Tolerance=5%, Voltage Rating=50V, Capacitance=10nF, Category="Ceramic Capacitors", ComponentLink1Description=http://www.yageo.com/documents/recent/UPY-GP_NP0_16V-to-50V_16.pdf?src-supplier=Digi-Key, ComponentLink1URL=http://www.yageo.com/documents/recent/UPY-GP_NP0_16V-to-50V_16.pdf?src-supplier=Digi-Key, ComponentLink2Description=http://www.yageo.com/exep/pages/download/literatures/ProductSelectionGuide%202014_Final_2.pdf?src-supplier=Digi-Key, ComponentLink2URL=http://www.yageo.com/exep/pages/download/literatures/ProductSelectionGuide%202014_Final_2.pdf?src-supplier=Digi-Key, Item Type=Capacitor, Length=0.063inch, Manufacturer Part Number=CC0603JRNPO9BN103, Mount="Surface Mount", Packaging="Tape and Reel", Pricing 1="1=0.42340, 10=0.29770, 25=0.25590, 100=0.19550, 250=0.19360, 500=0.14320, 1000=0.12060, 3000=0.11930 (USD)", RoHS=Yes, RoHS Compliant=Yes, Stock 1=5425, Supplier 1="Arrow Electronics", Supplier Part Number 1=CC0603JRNPO9BN103, Thickness=0.035inch, Width=0.031inch
C3 C19 C20 C51 C52: library part CL21A226MOCLRNC, "CAP CER 22UF 16V X5R 0805", Case Code (Imperial)=0805, Case Code (Metric)=2012, LCSC Part Number=C398815, Manufacturer=Samsung, Max Operating Temperature=85°C, Min Operating Temperature=-55°C, Tolerance=20%, Voltage Rating=16V, Case/Package=0805, Category="Ceramic Capacitors", ComponentLink1Description=http://www.samsungsem.com/kr/support/product-search/mlcc/CL21A226MOCLRNC.jsp?src-supplier=Digi-Key, ComponentLink1URL=http://www.samsungsem.com/kr/support/product-search/mlcc/CL21A226MOCLRNC.jsp?src-supplier=Digi-Key, Item Type=Capacitor, Length=0.079inch, Manufacturer Part Number=CL21A226MOCLRNC, Mounting Technology="Surface Mount", Packaging="Tape and Reel", Pricing 1="1=0.29150, 10=0.21440, 25=0.20710, 100=0.12030, 250=0.11910, 500=0.11790, 1000=0.09220, 3000=0.07810, 6000=0.07720, 15000=0.06700 (USD)", RoHS=Yes, RoHS Compliant=Yes, Stock 1=10030, Supplier 1="Arrow Electronics", Supplier Part Number 1=CL21A226MOCLRNC, Thickness=0.037inch, Width=0.049inch